# Altium PCB 8080-10串3V.PcbDoc
Units mm, origin at the board's own origin, x right, y up, seen from the top; angles counter-clockwise.
Board outline 80 x 78 mm, 2 copper layers (Top Layer, Bottom Layer), stack 3.066 mm thick; 13 components, 11 nets, 47 pads, 0 vias.
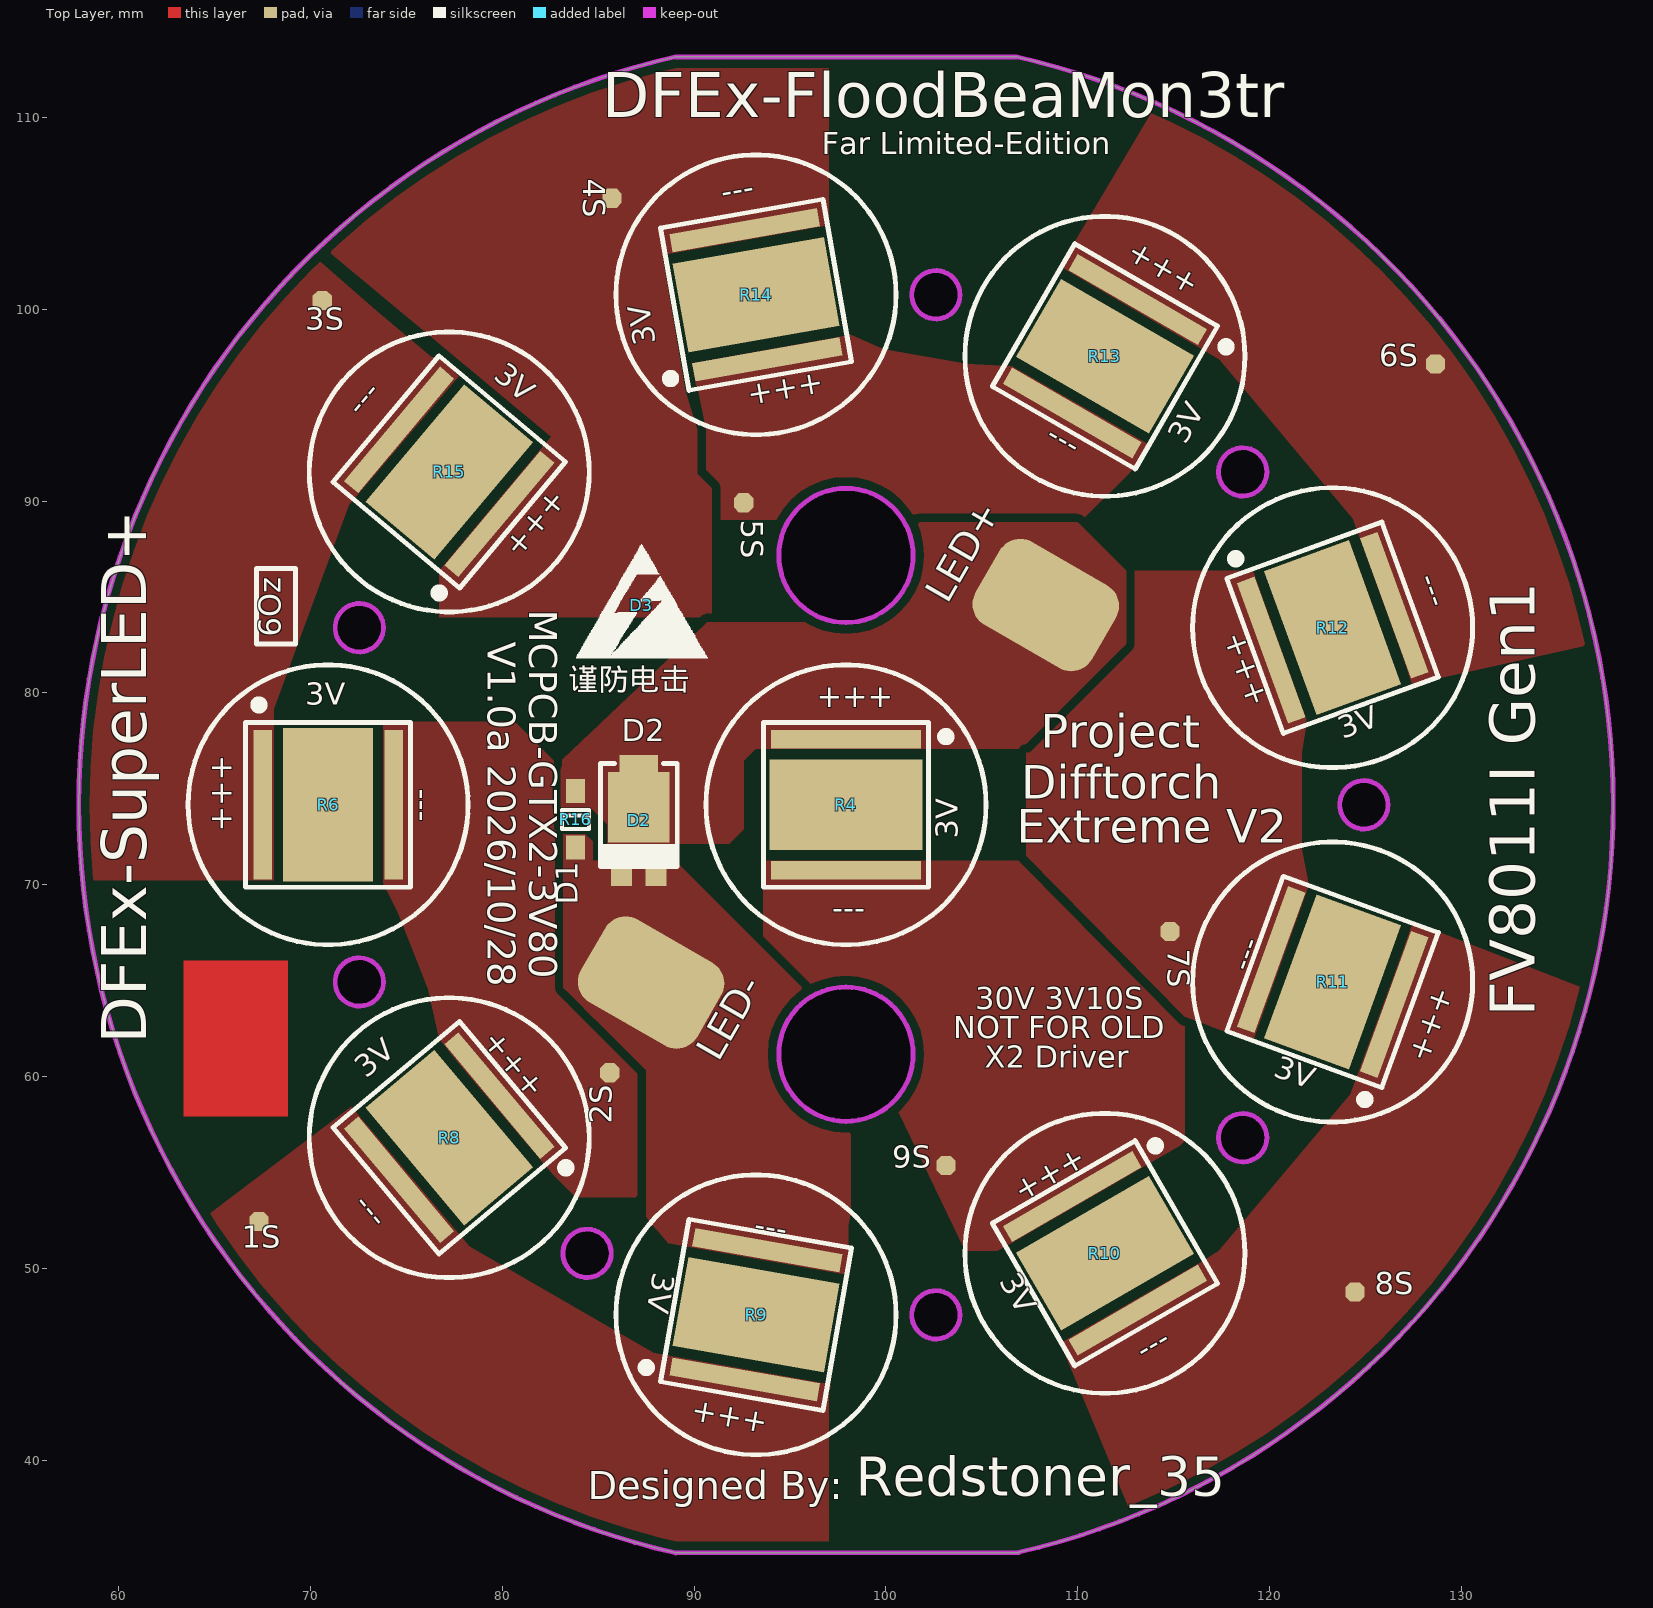
[diagram p0: Top Layer view]
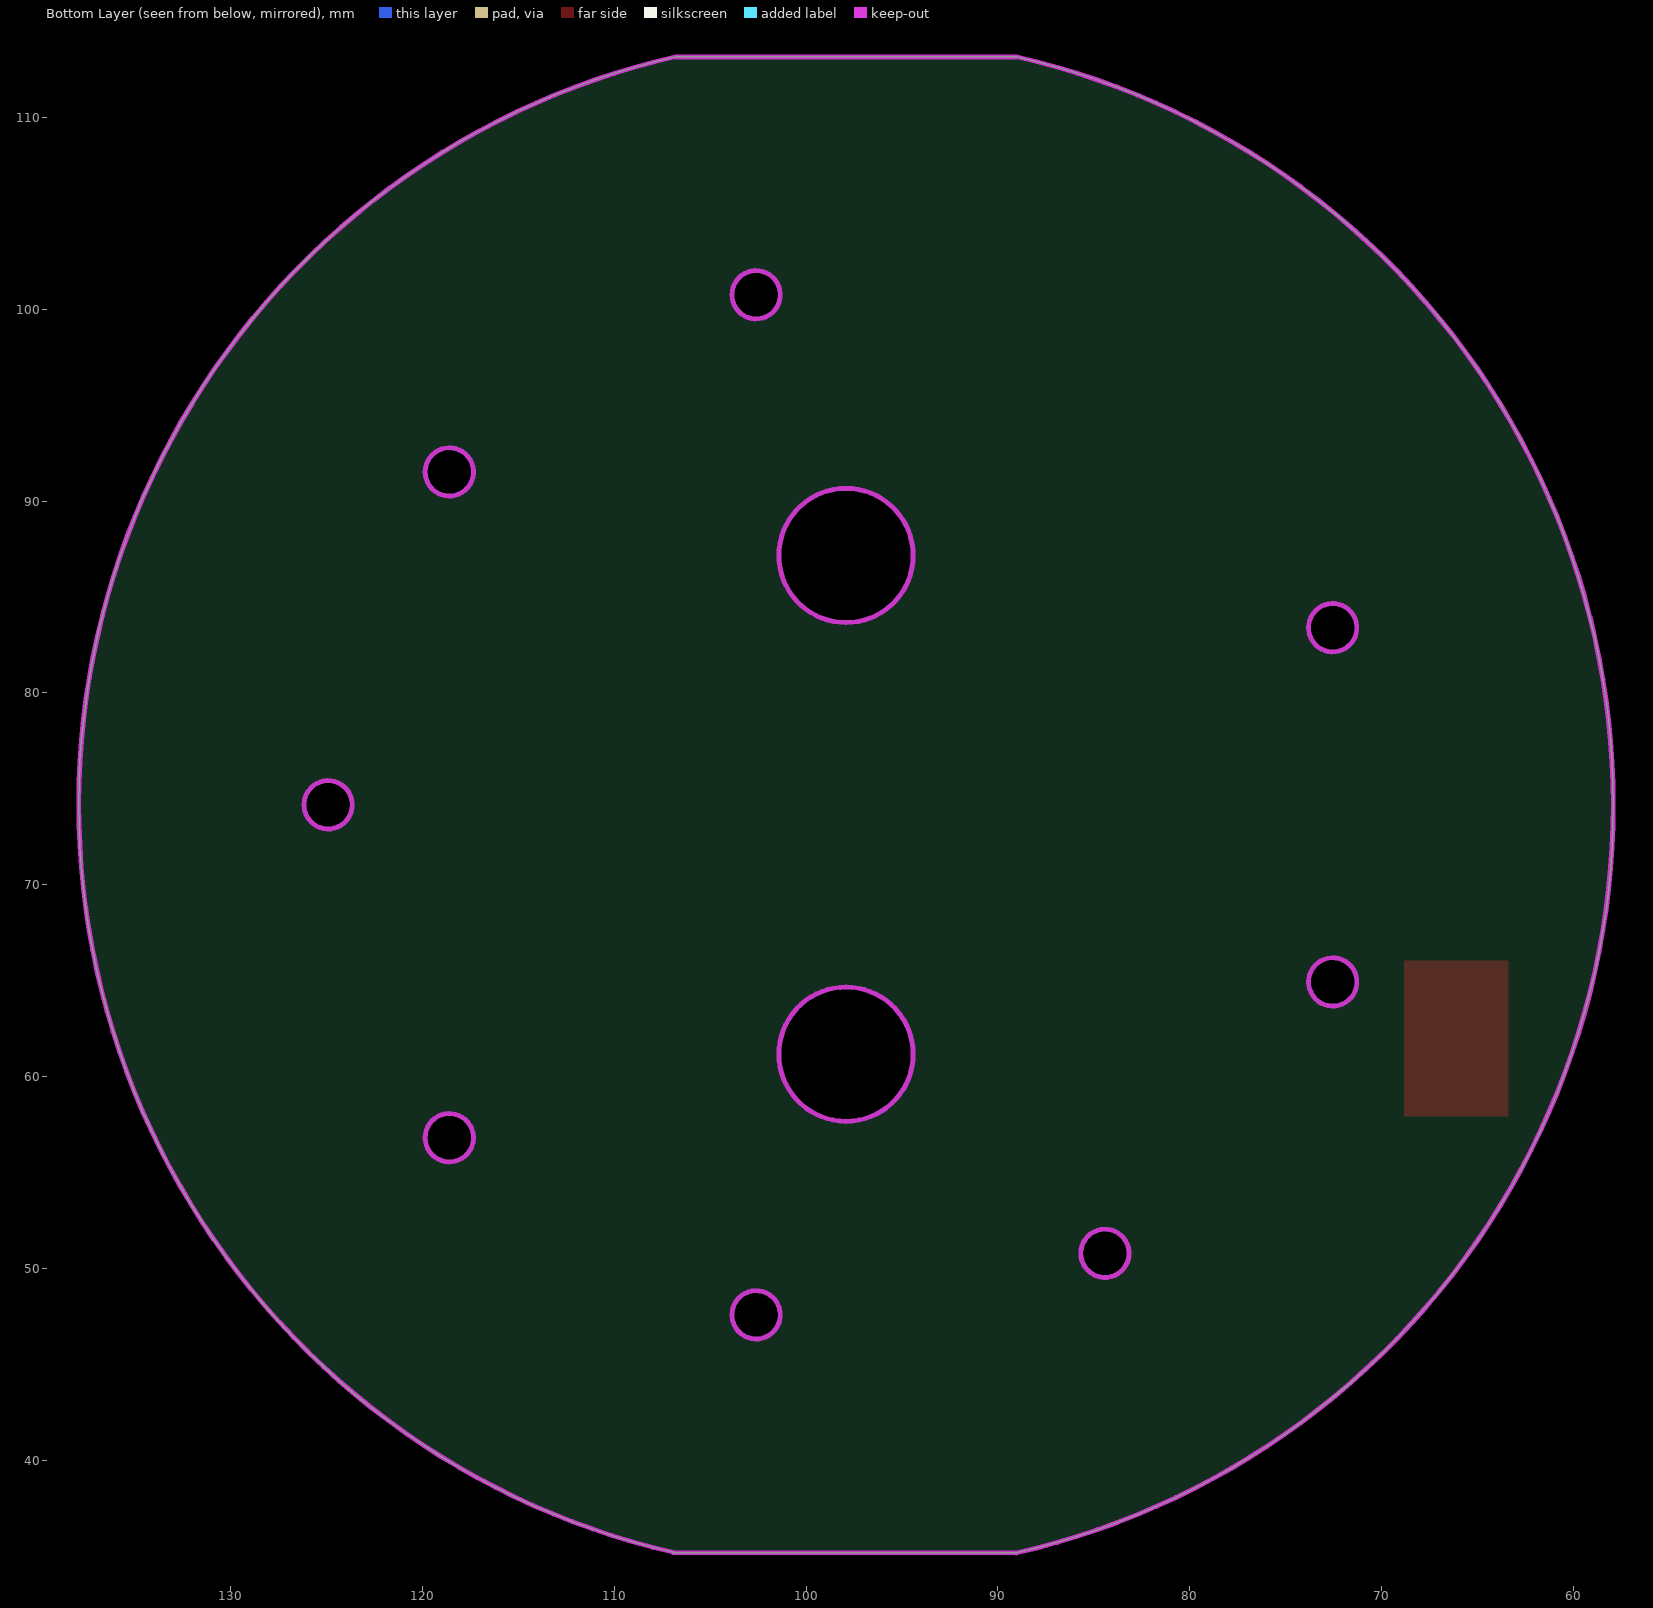
[diagram p1: Bottom Layer view, seen from below]
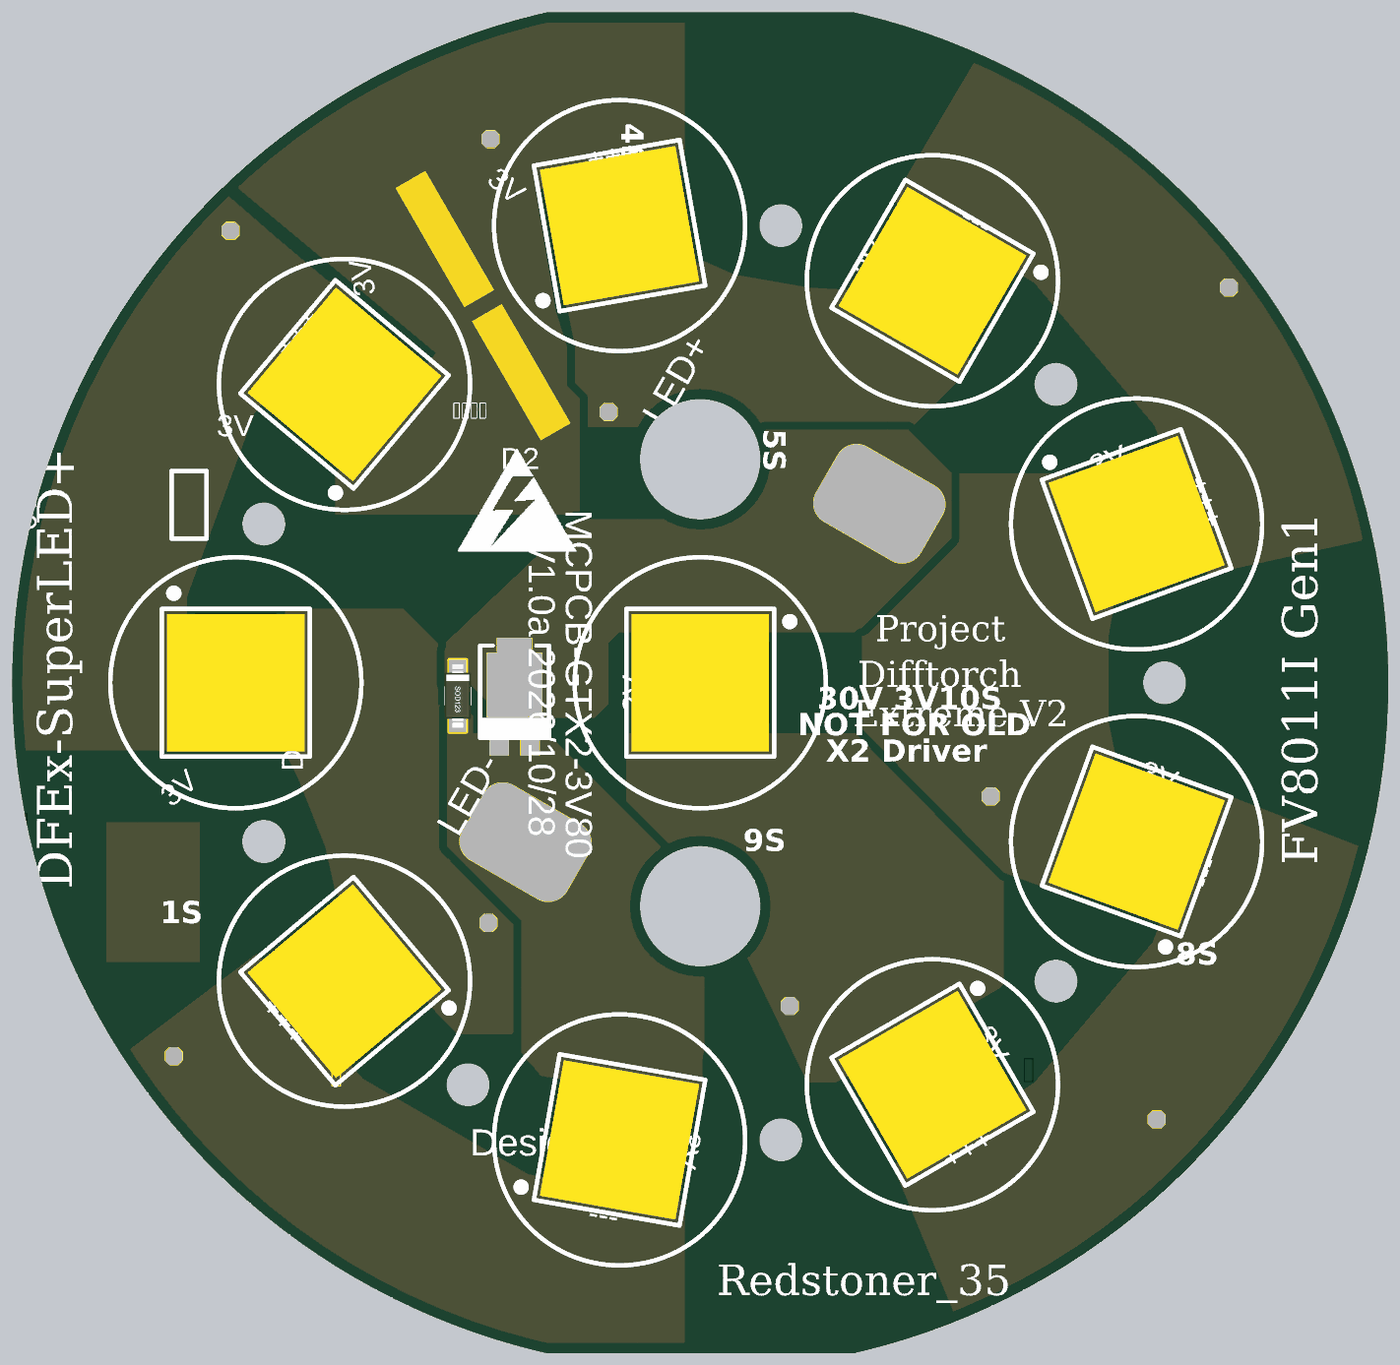
[diagram p2: 3D render of the assembled board from above, using the file's embedded part models]

## Layer stack, top to bottom
Top Solder: solder mask 0.0102, Solder Resist, Dk 3.5
Top Layer: signal copper 0.21
Dielectric 1: dielectric 2.82, FR-4, Dk 4.8
Bottom Layer: signal copper 0.0356
Bottom Solder: solder mask 0.0102, Solder Resist, Dk 3.5

## Board outline
89.025,35.169 cw(c97.919,74.168) 89.027,113.167 89.027,113.157 106.809,113.157 106.81,113.167 cw(c97.917,74.168) 106.93,35.197 106.93,35.179
cut-out: 83.167,50.785 ccw(c84.417,50.785) 84.417,49.535 ccw(c84.417,50.785) 85.667,50.785 ccw(c84.417,50.785) 84.417,52.035 ccw(c84.417,50.785)
cut-out: 101.356,47.578 ccw(c102.606,47.578) 102.606,46.328 ccw(c102.606,47.578) 103.856,47.578 ccw(c102.606,47.578) 102.606,48.828 ccw(c102.606,47.578)
cut-out: 117.35,56.813 ccw(c118.6,56.813) 118.6,55.563 ccw(c118.6,56.813) 119.85,56.813 ccw(c118.6,56.813) 118.6,58.063 ccw(c118.6,56.813)
cut-out: 123.667,74.168 ccw(c124.917,74.168) 124.917,72.918 ccw(c124.917,74.168) 126.167,74.168 ccw(c124.917,74.168) 124.917,75.418 ccw(c124.917,74.168)
cut-out: 117.35,91.523 ccw(c118.6,91.523) 118.6,90.273 ccw(c118.6,91.523) 119.85,91.523 ccw(c118.6,91.523) 118.6,92.773 ccw(c118.6,91.523)
cut-out: 101.356,100.758 ccw(c102.606,100.758) 102.606,99.508 ccw(c102.606,100.758) 103.856,100.758 ccw(c102.606,100.758) 102.606,102.008 ccw(c102.606,100.758)
cut-out: 72.545,82.153 cw(c72.545,83.403) 71.295,83.403 cw(c72.545,83.403) 72.545,84.653 cw(c72.545,83.403) 73.795,83.403 cw(c72.545,83.403)
cut-out: 94.417,87.168 ccw(c97.917,87.168) 97.917,83.668 ccw(c97.917,87.168) 101.417,87.168 ccw(c97.917,87.168) 97.917,90.668 ccw(c97.917,87.168)
cut-out: 94.417,61.168 ccw(c97.917,61.168) 97.917,57.668 ccw(c97.917,61.168) 101.417,61.168 ccw(c97.917,61.168) 97.917,64.668 ccw(c97.917,61.168)
cut-out: 71.285,64.933 ccw(c72.545,64.933) 72.545,63.673 ccw(c72.545,64.933) 73.805,64.933 ccw(c72.545,64.933) 72.545,66.193 ccw(c72.545,64.933)

## Design rules (kind name [scope] priority, off if disabled: settings)
Clearance [All] p1: gap=0.45
PolygonConnect [All] p1: connectstyle=Direct reliefconductorwidth=0.254 reliefentries=4 polygonreliefangle="90 Angle" airgapwidth=0.254
RoutingVias [All] p1: holewidth=0.711 width=1.27 viastyle="Through Hole" minholewidth=0.711 minwidth=1.27 maxholewidth=0.711 maxwidth=1.27
SolderMaskExpansion [All] p1: expansion=0.102
Width [All] p1: maxlimit=100 minlimit=0.45 preferedwidth=0.8
30 further rules are at their usual default settings.

## Components (designator, comment, footprint, x,y, rotation, side; value= is the part's Value field where it differs from the comment)
D2 "PT30L80SP" TO277 87.122,74.041 r0 top
D3 "PT30L80SP" HIGH-VOLTAGE-2 87.249,84.582 r0 top
R4 "5A 一次性慢熔" FV8011I 97.917,74.168 r90 top locked
R6 "5A 一次性慢熔" FV8011I 70.917,74.168 r0 top
R8 "5A 一次性慢熔" FV8011I 77.234,56.813 r40 top
R9 "5A 一次性慢熔" FV8011I 93.229,47.578 r80 top
R10 "5A 一次性慢熔" FV8011I 111.417,50.785 r120 top
R11 "5A 一次性慢熔" FV8011I 123.289,64.933 r160 top
R12 "5A 一次性慢熔" FV8011I 123.289,83.403 r200 top
R13 "5A 一次性慢熔" FV8011I 111.417,97.551 r240 top
R14 "5A 一次性慢熔" FV8011I 93.228,100.758 r280 top
R15 "5A 一次性慢熔" FV8011I 77.234,91.523 r320 top
R16 "5A 一次性慢熔" SOD-123 83.82,73.406 r270 top

## Footprints (in the part's own frame and the unit in brackets; to place one, negate y for a bottom-side part, rotate by r counter-clockwise, add the part's x,y. Pads: shape width x height; smd on the part's side, far side on the other; paste and mask are expansions set on the pad)
FV8011I [mm] "FV8011I 3V Ultra High intensity LED Based on SANAN VT LED"
  rect 4.7x8 smd mask+0.03: 0(0,0)
  rect 0.97x7.8 smd mask+0.03: 1(-3.415,0) 2(3.415,0)
  silkscreen extent -4.3,-4.3 4.3,4.3, body extent -4,-4 4,4, height 0.93
HIGH-VOLTAGE-2 [mm]
  silkscreen extent -3.4,-2.75 3.46,3.17
SOD-123 [mm]
  rect 1.25x1 smd: 1(1.475,0) 2(-1.475,0)
  silkscreen extent -0.5,-0.7 0.5,0.7, body extent -1.85,-0.77 1.85,0.78, height 1.35
TO277 [mm]
  rect 3.2x3.7 smd mask+0.03: 1(0,0)
  rect 2x0.9 smd mask+0.03: 1(0,2.275)
  rect 1.1x0.9 smd mask+0.03: 2(-0.9,-3.65) 3(0.9,-3.65)
  silkscreen extent -2,-3.09 2,2.29, body extent -2.03,-3.05 2.03,2.29, height 1.1

## Free pads (board coordinates)
  oct 1x1 smd mask+0.03: 0(67.31,52.451) 0(85.598,60.198) 1(70.612,100.457) 2(85.725,105.791) 3(92.583,89.916) 4(128.651,97.155) 5(124.46,48.768) 6(114.808,67.564) 7(103.124,55.372)
  rrect50% 5x7 smd rot 60 mask+0.03: 4(87.757,64.897) 4(108.331,84.582)

## Nets (pads, with @x,y where several pads share a name; then routed paths per layer and width w, separated by ;. In a path a pad name is that pad's centre, name@x,y a point inside that pad or via, vN(x,y) a via of type N, cw(c..) or ccw(c..) an arc to the next point about the centre after c; other vN are vias at no path point)
3V: pad.0@67.31,52.451 R8.1 R9.1
6V: pad.0@85.598,60.198 R6.2 R8.2
9V: pad.1 R6.1 R15.1
12V: pad.2 R14.1 R15.2
15V: pad.3 R13.2 R14.2
18V: pad.4@128.651,97.155 R12.1 R13.1
21V: pad.6 R11.2 R12.2
24V: pad.5 R10.1 R11.1
27V: pad.7 R4.1 R10.2
LED+: D2.1 pad.4@108.331,84.582 R4.2 R16.2
LED-: D2.2 D2.3 pad.4@87.757,64.897 R9.2 R16.1
pads on no net: R4.0 R6.0 R8.0 R9.0 R10.0 R11.0 R12.0 R13.0 R14.0 R15.0

## Polygon pours and split planes (outlines as drawn)
LED- on Top Layer "Component Side-No Net 1" (solid, remove dead copper, pour order 54): 87.503,52.705 88.646,51.308 98.044,49.657 98.044,58.801 88.011,63.881 87.503,64.008
3V on Top Layer "Component Side-No Net 1" (solid, remove dead copper, pour order 52): 97.028,43.561 97.155,43.942 87.122,45.72 81.915,41.021 95.25,35.941 97.028,35.927
3V on Top Layer "Component Side-No Net 1" (solid, remove dead copper, pour order 50): 79.121,50.165 72.136,58.42 63.881,52.197 65.786,47.117 76.073,43.053
6V on Top Layer "Component Side-No Net 1" (solid, remove dead copper, pour order 48): 75.946,65.405 76.708,61.976 77.724,60.706 82.677,54.864 83.82,53.721 84.582,53.721 84.709,57.658 84.328,61.087
6V on Top Layer "Component Side-No Net 1" (solid, remove dead copper, pour order 46): 74.041,78.486 73.787,78.486 73.787,70.104 74.549,68.58 78.105,68.072 77.724,78.486
9V on Top Layer "Component Side-No Net 1" (solid, remove dead copper, pour order 44): 68.072,79.375 68.072,78.486 68.072,70.231 65.659,70.231 64.77,79.502
9V on Top Layer "Component Side-No Net 1" (solid, remove dead copper, pour order 42): 76.708,97.536 77.724,96.52 71.755,89.535 70.358,89.408 70.612,97.409
12V on Top Layer "Component Side-No Net 1" (solid, remove dead copper, pour order 40): 88.138,102.743 88.441,102.857 96.393,104.267 97.028,104.394 97.028,114.173 85.471,113.792 85.344,103.378
15V on Top Layer "Component Side-No Net 1" (solid, remove dead copper, pour order 38): 88.9,97.155 89.662,97.155 98.171,98.679 100.457,97.663 100.711,92.964 88.9,90.551
15V on Top Layer "Component Side-No Net 1" (solid, remove dead copper, pour order 36): 104.14,97.155 106.553,97.028 113.665,92.964 113.03,91.821 110.37,89.161 101.727,89.359
18V on Top Layer "Component Side-No Net 1" (solid, remove dead copper, pour order 34): 109.093,102.235 117.602,97.282 119.38,101.6 120.015,105.156 119.507,107.95 114.127,110.736
18V on Top Layer "Component Side-No Net 1" (solid, remove dead copper, pour order 32): 127.508,80.264 127,81.788 124.46,88.773 123.825,90.424 135.128,93.726 138.049,82.804 128.27,80.645
21V on Top Layer "Component Side-No Net 1" (solid, remove dead copper, pour order 30): 121.666,76.884 121.92,78.359 121.92,78.613 119.126,86.36 117.729,86.36 117.221,76.835
21V on Top Layer "Component Side-No Net 1" (solid, remove dead copper, pour order 28): 116.967,62.611 119.126,61.849 122.047,69.977 121.539,72.517 114.173,71.882 114.681,65.278
24V on Top Layer "Component Side-No Net 1" (solid, remove dead copper, pour order 26): 129.286,67.31 127.508,68.072 126.492,65.278 124.079,58.674 129.54,57.023 131.572,65.786
24V on Top Layer "Component Side-No Net 1" (solid, remove dead copper, pour order 24): 109.855,44.323 109.093,46.101 113.284,48.514 116.586,50.419 119.507,52.324 125.476,58.547 124.968,48.641 113.157,36.322
27V on Top Layer "Component Side-No Net 1" (solid, remove dead copper, pour order 22): 104.14,50.927 105.537,50.927 105.791,50.927 106.299,51.181 115.316,56.388 115.57,56.642 115.57,58.764 104.14,55.372
27V on Top Layer "Component Side-No Net 1" (solid, remove dead copper, pour order 18): 93.599,67.183 93.599,71.247 106.934,71.247 107.95,70.231 108.204,69.977 108.204,65.786
LED+ on Top Layer "Component Side-No Net 1" (solid, remove dead copper, pour order 16): 107.442,77.47 107.061,77.089 101.473,77.089 91.948,77.089 91.186,77.851 91.423,78.088 91.423,79.41 106.772,79.41 106.807,79.375
LED- on Top Layer "Component Side-No Net 1" (solid, remove dead copper, pour order 12): 83.693,71.247 83.693,65.024 83.693,64.135 86.868,60.96 90.043,57.785 90.043,52.324 89.916,51.435 97.663,50.038 98.171,52.959 98.171,58.166 97.409,59.817 96.266,60.96 96.266,64.135 96.139,64.135 93.091,67.183 89.027,71.247 88.138,71.247
LED+ on Top Layer "Component Side-No Net 1" (solid, remove dead copper, pour order 14): 83.058,74.041 84.582,74.041 84.963,73.66 85.471,73.152 85.471,72.136 89.154,72.136 91.44,72.136 91.821,72.136 92.329,72.644 92.583,72.898 92.583,76.454 93.472,77.343 93.726,77.343 95.377,77.343 107.315,77.343 112.268,82.296 112.522,82.55 112.522,85.852 112.522,86.36 110.744,88.138 109.982,88.9 102.616,88.9 101.543,88.9 101.151,88.507 99.568,86.925 99.568,84.582 98.249,84.582 97.368,83.7 93.091,83.693 90.678,83.693 83.058,76.454
LED- on Top Layer "Component Side-No Net 1" (solid, remove dead copper, pour order 16): 90.678,61.595 84.803,63.025 83.185,64.643 83.185,72.644 84.328,72.644 84.709,72.263 84.709,70.612 84.709,65.278
3V on Top Layer "Component Side-No Net 1" (solid, remove dead copper, pour order 18): 96.901,43.688 97.028,43.561 97.028,35.179 73.406,35.179 65.532,43.053 63.246,45.339 63.246,48.006 64.65,51.938 72.263,57.785 77.343,51.689 88.773,45.085
6V on Top Layer "Component Side-No Net 1" (solid, remove dead copper, pour order 20): 74.041,78.486 74.041,69.85 77.216,61.849 82.296,55.88 87.3,60.528 87.884,62.992 87.63,70.104 82.677,72.898 82.677,76.454 80.645,78.486
9V on Top Layer "Component Side-No Net 1" (solid, remove dead copper, pour order 22): 55.753,70.104 55.88,70.231 67.691,70.231 67.691,78.105 72.263,90.551 77.343,96.647 73.406,99.949 66.675,105.791 56.896,95.504
LED- on Top Layer "Component Side-No Net 1" (solid, remove dead copper, pour order 24): 87.503,63.373 87.503,55.16 87.503,52.705 87.63,52.578 87.63,52.451 88.265,51.816 90.551,51.308 91.821,64.643 87.884,66.04
12V on Top Layer "Component Side-No Net 1" (solid, remove dead copper, pour order 28): 76.708,86.36 82.55,93.345 68.834,104.775 70.485,107.442 84.963,114.173 96.266,114.681 99.187,114.808 96.901,113.919 96.52,113.665 96.393,113.411 96.52,105.41 96.647,104.648 88.265,103.251 89.535,95.758 90.17,93.726 90.17,92.456 90.17,91.44 90.805,90.805 90.932,90.678 90.932,83.947 87.249,83.947 79.756,83.947 76.708,83.947
15V on Top Layer "Component Side-No Net 1" (solid, remove dead copper, pour order 30): 89.916,96.901 90.043,96.266 90.17,91.44 90.17,89.027 92.583,89.027 104.394,89.027 110.236,89.027 112.649,91.44 113.411,92.71 110.998,94.107 106.426,96.774 97.663,98.298
18V on Top Layer "Component Side-No Net 1" (solid, remove dead copper, pour order 32): 109.601,102.362 115.316,112.141 133.985,102.87 140.081,93.98 142.367,84.455 136.945,82.932 127.635,80.772 124.841,88.519 116.713,98.171
21V on Top Layer "Component Side-No Net 1" (solid, remove dead copper, pour order 34): 118.745,86.36 112.522,86.36 112.522,82.55 107.315,77.343 107.315,71.501 115.57,63.119 118.745,61.976 121.666,69.85 121.666,78.232 118.872,86.233
24V on Top Layer "Component Side-No Net 1" (solid, remove dead copper, pour order 36): 127.762,67.945 138.557,63.754 131.572,38.735 115.697,33.02 112.268,34.671 112.395,35.941 113.157,36.576 109.347,45.847 111.125,46.863 116.713,50.165 124.841,59.817
27V on Top Layer "Component Side-No Net 1" (solid, remove dead copper, pour order 38): 93.599,70.993 93.599,66.421 95.885,64.389 99.441,63.881 100.4,58.685 104.14,50.927 106.045,51.435 113.538,55.626 115.57,57.658 115.57,63.119 107.569,70.993
6V on Top Layer "Component Side-No Net 1" (solid, remove dead copper, pour order 40): 81.534,56.642 83.185,54.737 84.201,53.721 88.646,53.721 88.646,62.103 88.773,62.23 87.431,63.572 84.256,63.572 78.939,63.572 77.216,61.849

## Keep-outs
Keep-Out Layer:
  circle w0.254: c102.606,100.758 r1.26
  circle w0.254: c118.6,91.523 r1.26
  circle w0.254: c124.917,74.168 r1.26
  circle w0.254: c118.6,56.813 r1.26
  circle w0.254: c102.606,47.578 r1.26
  circle w0.254: c84.417,50.785 r1.26
  circle w0.254: c72.545,64.933 r1.26
  circle w0.254: c72.545,83.403 r1.26
  circle w0.254: c97.917,61.168 r3.5
  circle w0.254: c97.917,87.168 r3.5
  lines w0.254: 89.025,35.169 cw(c97.919,74.168) 89.027,113.167 ; 89.025,35.179 106.93,35.179 ; 89.027,113.157 106.809,113.157 ; 106.81,113.167 cw(c97.917,74.168) 106.93,35.197

## Other copper
Top Layer:
  rectangle: 63.373,57.912 68.834,66.04

## Silkscreen, mask and mechanical layers (free items; w line width, h text height)
Top Overlay:
  circle w0.7: c103.124,77.724 r0.1
  circle w0.7: c67.31,79.375 r0.1
  circle w0.7: c76.708,85.217 r0.1
  circle w0.7: c88.773,96.393 r0.1
  circle w0.7: c117.729,98.044 r0.1
  circle w0.7: c118.237,86.995 r0.1
  circle w0.7: c124.968,58.801 r0.1
  circle w0.7: c114.046,56.388 r0.1
  circle w0.7: c87.503,44.831 r0.1
  circle w0.7: c83.312,55.245 r0.1
  circle w0.254: c97.917,74.168 r7.3
  circle w0.254: c77.234,91.523 r7.3
  circle w0.254: c93.229,100.758 r7.3
  circle w0.254: c111.417,97.551 r7.3
  circle w0.254: c123.289,83.403 r7.3
  circle w0.254: c123.289,64.933 r7.3
  circle w0.254: c111.417,50.785 r7.3
  circle w0.254: c93.228,47.578 r7.3
  circle w0.254: c77.234,56.813 r7.3
  circle w0.254: c70.917,74.168 r7.3
  circle w0.254: c70.917,74.168 r7.3
  rectangle: 85.122,70.951 89.122,72.136
  lines w0.254: 67.183,82.55 67.183,86.487 69.215,86.487 69.215,82.55 67.183,82.55
  text "DFEx-FloodBeaMon3tr" at 85.217,109.22 h4
  text "Far Limited-Edition" at 96.647,107.696 h2
  text "4S" at 83.82,106.807 h2 r270
  text "---" at 91.567,105.156 h2 r10
  text "+++" at 112.268,102.362 h2 r330
  text "3S" at 69.723,98.552 h2
  text "3V" at 88.392,98.298 h2 r100
  text "6S" at 125.73,96.647 h2
  text "3V" at 79.248,96.139 h2 r320
  text "+++" at 92.964,94.615 h2 r10
  text "---" at 72.898,94.107 h2 r50
  text "---" at 108.077,92.837 h2 r330
  text "3V" at 115.951,92.71 h2 r60
  text "5S" at 92.075,89.027 h2 r270
  text "+++" at 81.153,86.741 h2 r50
  text "---" at 127.381,85.852 h2 r290
  text "MCPCB-GTX2-3V80" at 80.899,84.328 h2.5 r270
  text "LED+" at 103.632,84.328 h2.5 r60
  text "6Oz" at 68.834,82.931 h2 r90
  text "+++" at 117.221,82.804 h2 r290
  text "V1.0a 2026/10/28" at 78.74,82.677 h2.5 r270
  text "谨防电击" at 83.439,79.756 h2
  text "3V" at 69.723,78.994 h2
  text "+++" at 96.393,78.867 h2
  text "3V" at 123.952,77.216 h2 r20
  text "D2" at 86.233,77.089 h2
  text "Project" at 108.077,76.581 h3
  text "Difftorch" at 107.061,73.914 h3
  text "---" at 76.581,73.279 h2 r90
  text "+++" at 66.294,72.771 h2 r90
  text "3V" at 104.14,72.39 h2 r90
  text "Extreme V2" at 106.807,71.628 h3
  text "---" at 98.933,69.469 h2 r180
  text "D1" at 84.328,68.961 h2 r90
  text "---" at 118.364,67.437 h2 r250
  text "7S" at 114.3,66.675 h2 r270
  text "+++" at 128.27,64.897 h2 r250
  text "30V 3V10S" at 104.648,63.119 h2
  text "FV8011I Gen1" at 134.62,63.119 h4 r90
  text "DFEx-SuperLED+" at 62.23,61.722 h4 r90
  text "NOT FOR OLD" at 103.505,61.595 h2
  text "LED-" at 91.694,60.452 h2.5 r60
  text "X2 Driver" at 105.156,60.071 h2
  text "+++" at 82.55,59.69 h2 r130
  text "3V" at 120.015,59.69 h2 r340
  text "3V" at 73.152,59.563 h2 r40
  text "2S" at 86.106,57.531 h2 r90
  text "+++" at 109.855,56.642 h2 r210
  text "9S" at 100.33,54.864 h2
  text "---" at 74.295,52.832 h2 r130
  text "---" at 94.996,52.705 h2 r170
  text "1S" at 66.421,50.673 h2
  text "3V" at 87.503,49.911 h2 r260
  text "3V" at 105.537,49.149 h2 r300
  text "8S" at 125.476,48.26 h2
  text "---" at 114.3,47.117 h2 r210
  text "+++" at 93.98,42.799 h2 r170
  text "Designed By:" at 84.455,37.465 h2.5
  text "Redstoner_35" at 98.425,37.465 h3.5
Top Solder:
  region: 90.378,89.265 86.378,96.193 84.646,95.193 88.646,88.265
  region: 85.933,97.012 81.933,103.94 80.201,102.94 84.201,96.012
  text "烫" at 75.184,103.251 h3
  text "烫" at 117.983,103.251 h3
  text "Gen 1/2" at 68.326,59.055 h2 r90
  text "FL8032P" at 66.675,58.801 h2 r90
  text "NOT FOR" at 65.024,58.674 h2 r90
  text "屯" at 116.586,41.656 h3
  text "屯" at 76.327,41.402 h3
Mechanical 6:
  circle w0.254: c102.606,100.758 r2.45
  circle w0.254: c118.6,91.523 r2.45
  circle w0.254: c124.917,74.168 r2.45
  circle w0.254: c118.6,56.813 r2.45
  circle w0.254: c102.606,47.578 r2.45
  circle w0.254: c84.417,50.785 r2.45
  circle w0.254: c72.545,83.403 r2.45
  circle w0.254: c72.545,64.933 r2.45